# Altium PCB BYTE_SPIne.PcbDoc (part 2 of 3)
Units mm, origin at the board's own origin, x right, y up, seen from the top; angles counter-clockwise.
Board outline 108 x 73 mm, 4 copper layers (Top Layer, GND, PWR, Bottom Layer), stack 1.586 mm thick; 173 components, 126 nets, 724 pads, 308 vias.
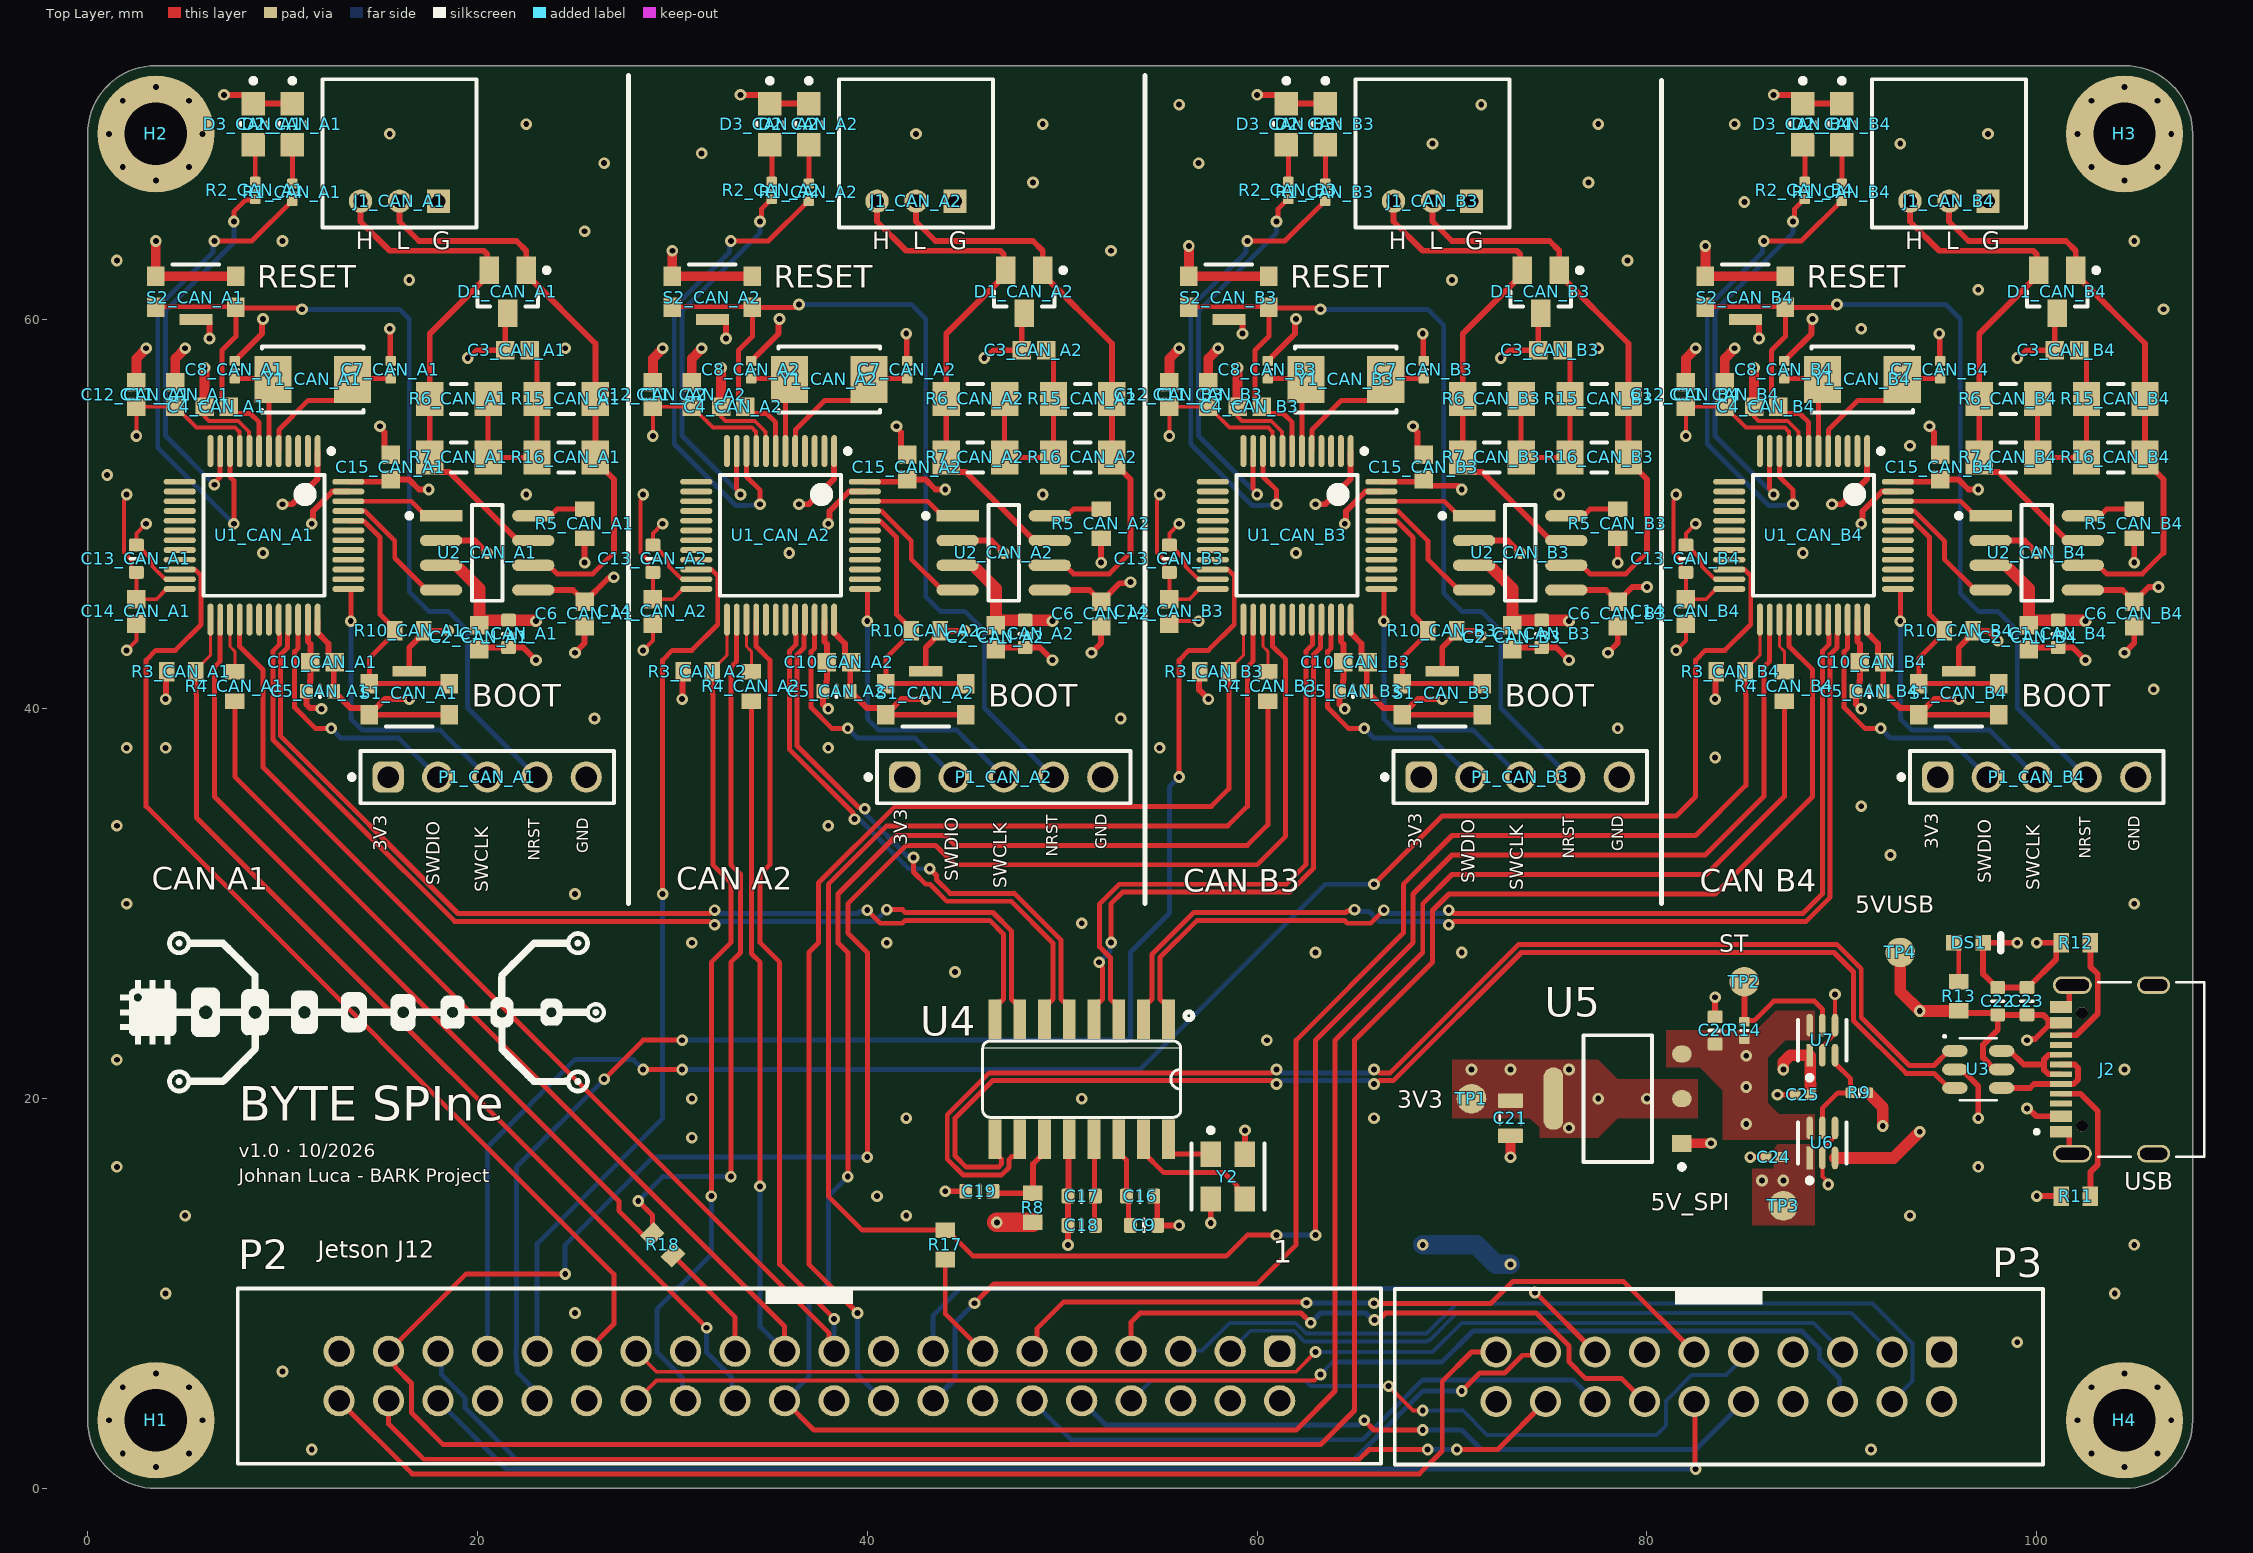
[diagram p0: Top Layer view]

## Via types
v1: diameter 0.6, hole 0.3, Top Layer to Bottom Layer, tented both sides, 308 vias

## Nets (pads, with @x,y where several pads share a name; then routed paths per layer and width w, separated by ;. In a path a pad name is that pad's centre, name@x,y a point inside that pad or via, vN(x,y) a via of type N, cw(c..) or ccw(c..) an arc to the next point about the centre after c; other vN are vias at no path point) (continued)
3V3_Jetson: (continued)
  Bottom Layer w1: v1(68.5,12.5) 71.25,12.5 72.25,11.5 v1(73,11.5)
5V: C1_CAN_A1.1 C1_CAN_A2.1 C1_CAN_B3.1 C1_CAN_B4.1 C2_CAN_A1.1 C2_CAN_A2.1 C2_CAN_B3.1 C2_CAN_B4.1 C20.2 R8.2 R14.2 U2_CAN_A1.3 U2_CAN_A2.3 U2_CAN_B3.3 U2_CAN_B4.3 U5.3 U6.6 U7.6 | length 239
  Top Layer w0.6: U2_CAN_A1.3@18.136,47.365 18.912,47.365 20.1,46.177 C2_CAN_A1.1@20.1,44.3 20.35,44.55 C1_CAN_A1.1@21.6,44.55 22.95,44.55 v1(23,44.5) ; U2_CAN_A2.3@44.636,47.365 45.412,47.365 46.6,46.177 C2_CAN_A2.1@46.6,44.3 46.85,44.55 C1_CAN_A2.1@48.1,44.55 49.45,44.55 v1(49.5,44.5) ; U2_CAN_B3.3@71.136,47.365 71.912,47.365 73.1,46.177 C2_CAN_B3.1@73.1,44.3 73.35,44.55 C1_CAN_B3.1@74.6,44.55 75.95,44.55 v1(76,44.5) ; U5.3@81.795,22.29 U5.3@81.828,22.29 ; U2_CAN_B4.3@97.636,47.365 98.412,47.365 99.6,46.177 C2_CAN_B4.1@99.6,44.3 99.85,44.55 C1_CAN_B4.1@101.1,44.55 102.45,44.55 v1(102.5,44.5)
  Top Layer w1: v1(46.65,13.65) R8.2@48.5,13.65
  PWR w1: v1(23,44.5) 25.5,44.5 27,43 27,40.5 35.25,32.25 40.25,32.25 42,30.5 57.041,30.5 63.041,24.5 75.5,24.5 77.629,22.371 79.5,22.371 79.5,25.5 72,33 63.5,33 52,44.5 v1(49.5,44.5) ; v1(46.65,13.65) 48.75,15.75 78,15.75 81.375,19.125 81.375,22.125 ; v1(76,44.5) 79,44.5 80,43.5 80,40.5 82,38.5 82,22.5 ; 87.5,23.5 87.5,39.914 89.586,42 100,42 v1(102.5,44.5)
  other v1: 85.1,18.7 85.1,20.6 85.1,22.2
5V_SPI: C24.2 P2.2 P2.4 R9.2 TP3.1 U6.1 | length 42.5
  Top Layer w0.6: R9.2@91.35,20.3 92.1,19.55 v1(92.1,18.6)
  PWR w1: P2.4@58.62,4.5 P2.2@61.16,4.5 64,4.5 73.5,14 89.5,14 92.1,16.6 v1(92.1,18.6)
  other v1: 85.9,15.8 87,15.8
5VUSB: C22.1 C23.1 C25.2 J2.A4_B9 J2.B4_A9 R13.2 TP4.1 U3.5 U6.3 U7.1 | length 43.8
  Top Layer w0.3: R13.2@96,24.5 96.1,24.4 97.9,24.4 C22.1@98,24.3 ; U3.5@98.2,21.5 97.85,21.5 97.25,22.1 97.25,22.77 98,23.52 C22.1@98,24.3 ; v1(99.5,19.5) 99.581,19.5 99.981,19.1 J2.A4_B9@101.25,19.1 ; v1(99.5,23) 99.557,23.057 99.913,23.057 100.606,23.75 ; J2.B4_A9@101.25,23.9 101.1,23.75 100.606,23.75 ; C22.1@98,24.3 C23.1@99.5,24.3 100.33,24.3 100.606,24.024 100.606,23.75
  Top Layer w0.6: v1(87,21.5) 87,21.878 87.351,22.23 U7.1@88.35,22.23 ; U7.1@88.382,22.198 88.382,20.748 88.39,20.74 C25.2@88.39,20.2 ; U6.3@89.65,16.96 92.66,16.96 v1(94,18.3) ; TP4.1@93,27.5 93,25.5 v1(94,24.5) R13.2@96,24.5
  PWR w0.3: v1(99.5,19.5) v1(99.5,23)
  PWR w0.6: v1(87,21.5) 93.9,21.5 94,21.4 ; v1(94,18.3) 94,21.4 ; v1(94,24.5) 94,21.4
BOOT0_CAN_A1: R10_CAN_A1.1 S1_CAN_A1.1 S1_CAN_A1.4 U1_CAN_A1.44 | length 14.4
  Top Layer w0.254: U1_CAN_A1.44@13.375,49.65 13.384,49.641 14.163,49.641 15,48.804 15,44.85 15.75,44.1 R10_CAN_A1.1@15.75,44 15.75,43.9 14.45,42.6 S1_CAN_A1.1@14.45,41.3 S1_CAN_A1.4@18.55,41.3
BOOT0_CAN_A2: R10_CAN_A2.1 S1_CAN_A2.1 S1_CAN_A2.4 U1_CAN_A2.44 | length 14.2
  Top Layer w0.254: U1_CAN_A2.44@39.875,49.65 39.884,49.641 40.663,49.641 41.5,48.804 41.5,44.85 R10_CAN_A2.1@42.25,44.1 ; R10_CAN_A2.1@42.25,43.9 40.95,42.6 S1_CAN_A2.1@40.95,41.3 S1_CAN_A2.4@45.05,41.3
BOOT0_CAN_B3: R10_CAN_B3.1 S1_CAN_B3.1 S1_CAN_B3.4 U1_CAN_B3.44 | length 14.2
  Top Layer w0.254: U1_CAN_B3.44@66.375,49.65 66.384,49.641 67.163,49.641 68,48.804 68,44.85 R10_CAN_B3.1@68.75,44.1 ; R10_CAN_B3.1@68.75,43.9 67.45,42.6 S1_CAN_B3.1@67.45,41.3 S1_CAN_B3.4@71.55,41.3
BOOT0_CAN_B4: R10_CAN_B4.1 S1_CAN_B4.1 S1_CAN_B4.4 U1_CAN_B4.44 | length 14.2
  Top Layer w0.254: U1_CAN_B4.44@92.875,49.65 92.884,49.641 93.663,49.641 94.5,48.804 94.5,44.85 R10_CAN_B4.1@95.25,44.1 ; R10_CAN_B4.1@95.25,43.9 93.95,42.6 S1_CAN_B4.1@93.95,41.3 S1_CAN_B4.4@98.05,41.3
CAN_RX_CAN_A1: U1_CAN_A1.45 U2_CAN_A1.4 | length 7
  Top Layer w0.254: U1_CAN_A1.45@13.375,50.15 13.384,50.141 14.234,50.141 15.757,48.618 15.757,47.743 17.405,46.095 U2_CAN_A1.4@18.136,46.095
CAN_RX_CAN_A2: U1_CAN_A2.45 U2_CAN_A2.4 | length 7
  Top Layer w0.254: U1_CAN_A2.45@39.875,50.15 39.884,50.141 40.734,50.141 42.257,48.618 42.257,47.681 43.843,46.095 U2_CAN_A2.4@44.636,46.095
CAN_RX_CAN_B3: U1_CAN_B3.45 U2_CAN_B3.4 | length 7
  Top Layer w0.254: U1_CAN_B3.45@66.375,50.15 66.384,50.141 67.234,50.141 68.757,48.618 68.757,47.681 70.343,46.095 U2_CAN_B3.4@71.136,46.095
CAN_RX_CAN_B4: U1_CAN_B4.45 U2_CAN_B4.4 | length 7
  Top Layer w0.254: U1_CAN_B4.45@92.875,50.15 92.884,50.141 93.734,50.141 95.257,48.618 95.257,47.681 96.843,46.095 U2_CAN_B4.4@97.636,46.095
CAN_TX_CAN_A1: U1_CAN_A1.46 U2_CAN_A1.1 | length 5.1
  Top Layer w0.254: U1_CAN_A1.46@13.375,50.65 16.598,50.65 17.343,49.905 U2_CAN_A1.1@18.136,49.905
CAN_TX_CAN_A2: U1_CAN_A2.46 U2_CAN_A2.1 | length 5.1
  Top Layer w0.254: U1_CAN_A2.46@39.875,50.65 43.098,50.65 43.843,49.905 U2_CAN_A2.1@44.636,49.905
CAN_TX_CAN_B3: U1_CAN_B3.46 U2_CAN_B3.1 | length 5.1
  Top Layer w0.254: U1_CAN_B3.46@66.375,50.65 69.598,50.65 70.343,49.905 U2_CAN_B3.1@71.136,49.905

## Text inside footprints (layer, text, board x,y; h text height)
J2: Top Assembly "PCB EDGE" at 0,9 h0.61 r90